# Altium PCB X-CARD-Adapter.PcbDoc
Units mil, origin at the board's own origin, x right, y up, seen from the top; angles counter-clockwise.
Board outline 5300 x 4675 mil, 2 copper layers (Top Layer, Bottom Layer); 86 components, 126 nets, 441 pads, 81 vias.
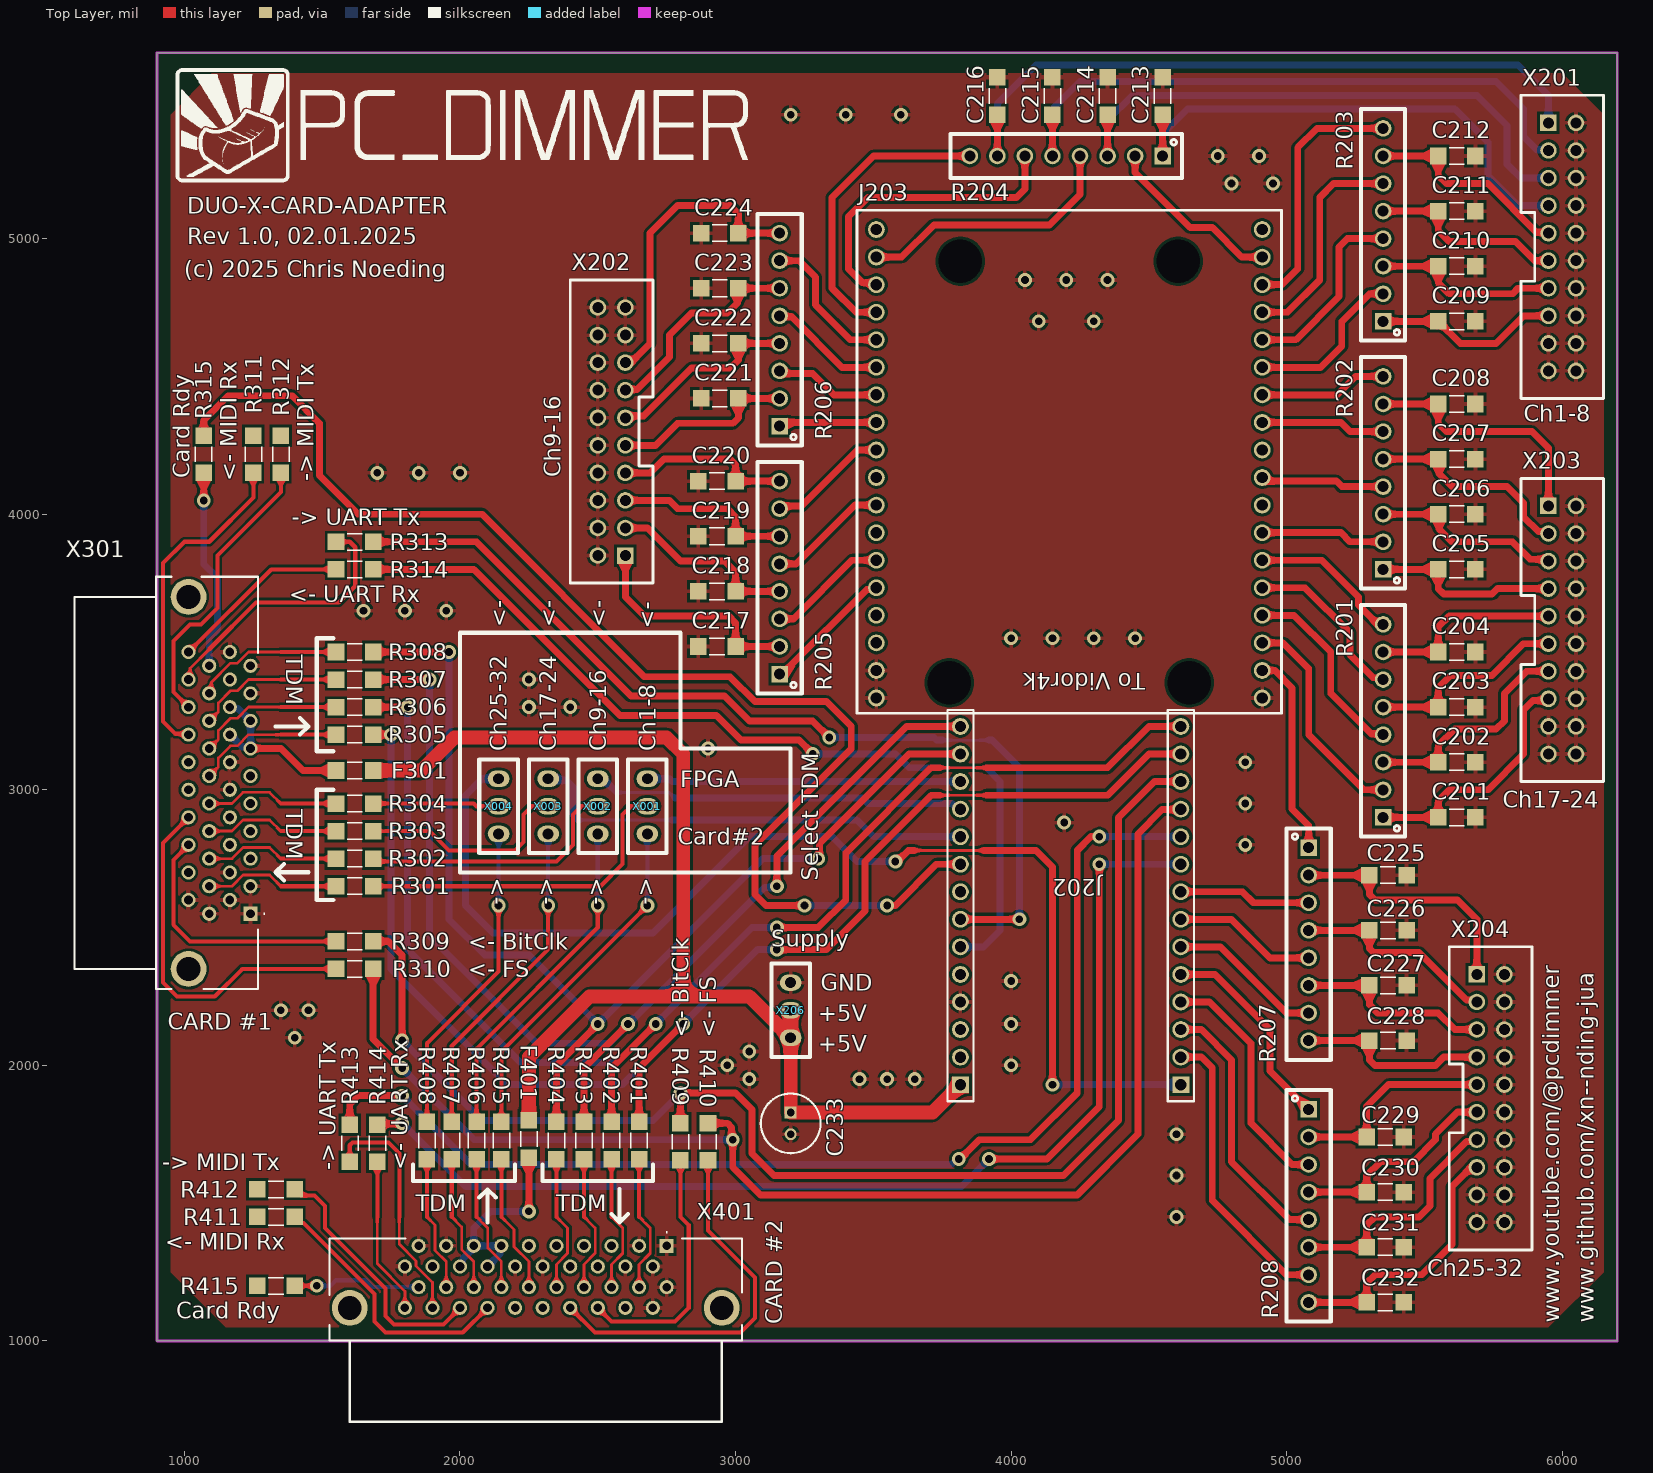
[diagram p0: Top Layer view]
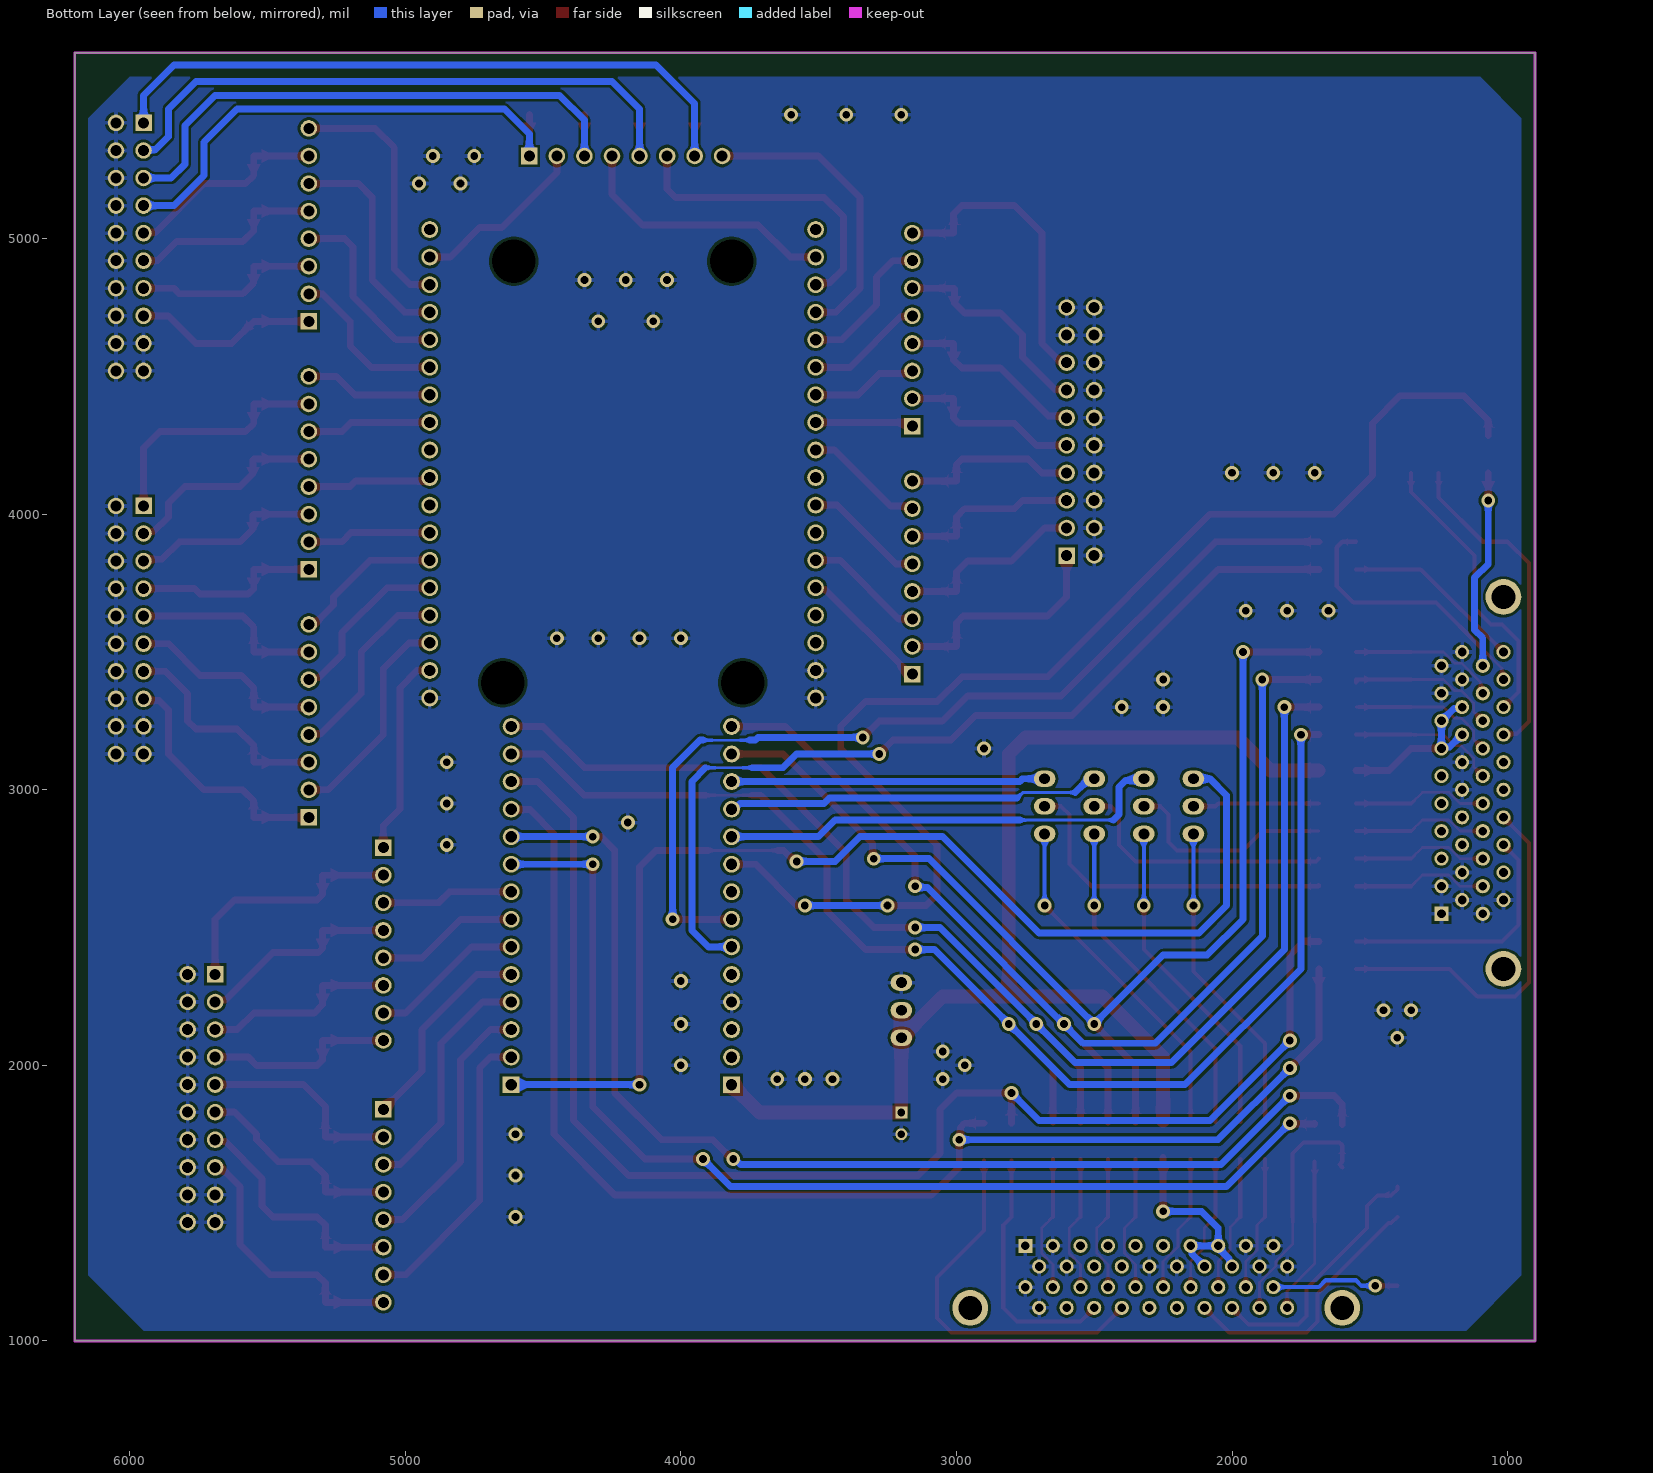
[diagram p1: Bottom Layer view, seen from below]

## Layer stack, top to bottom
Top Solder: solder mask 0.4, Solder Resist, Dk 3.5
Top Layer: signal copper 1.4
Dielectric 1: dielectric 12.6, FR-4, Dk 4.8
Bottom Layer: signal copper 1.4
Bottom Solder: solder mask 0.4, Solder Resist, Dk 3.5

## Board outline
900,1000 900,5675 6200,5675 6200,1000

## Design rules (kind name [scope] priority, off if disabled: settings)
Clearance [All] p1: gap=10 ignorepadtopadclearanceinfootprint=FALSE
Height [All] p1: minheight=0 maxheight=944.88 prefheight=500
PolygonConnect [All] p1: connectstyle=Relief reliefconductorwidth=15 reliefentries=4 polygonreliefangle="90 Angle" airgapwidth=10
RoutingVias [All] p1: holewidth=28 width=50 viastyle="Through Hole" minholewidth=28 minwidth=50 maxholewidth=28 maxwidth=50
SolderMaskExpansion [All] p1: expansion=4 istentingtop=FALSE
SupplyNets "Schematic Supply Nets_1" [InNet('GND')] p1: voltage=0.000
SupplyNets "Schematic Supply Nets" [InNet('+5V')] p2: voltage=0.000
Width [All] p1: maxlimit=50 minlimit=10 preferedwidth=25
29 further rules are at their usual default settings.

## Classes and differential pairs
component class S003: F401 R401 R402 R403 R404 R405 R406 R407 R408 R409 R410 R411 R412 R413 R414 R415 X401
component class Top: X001 X002 X003 X004
component class S001: C201 C202 C203 C204 C205 C206 C207 C208 C209 C210 C211 C212 C213 C214 C215 C216 C217 C218 C219 C220 C221 C222 C223 C224 C225 C226 C227 C228 C229 C230 C231 C232 C233 J202 J203 R201 R202 R203 R204 R205 R206 R207 R208 X201 X202 X203 X204 X206
component class S002: F301 R301 R302 R303 R304 R305 R306 R307 R308 R309 R310 R311 R312 R313 R314 R315 X301

## Components (designator, comment, footprint, x,y, rotation, side; value= is the part's Value field where it differs from the comment)
C201 "330pF" 1206 5550,2900 r0 top
C202 "330pF" 1206 5550,3100 r0 top
C203 "330pF" 1206 5550,3300 r0 top
C204 "330pF" 1206 5550,3500 r0 top
C205 "330pF" 1206 5550,3800 r0 top
C206 "330pF" 1206 5550,4000 r0 top
C207 "330pF" 1206 5550,4200 r0 top
C208 "330pF" 1206 5550,4400 r0 top
C209 "330pF" 1206 5550,4700 r0 top
C210 "330pF" 1206 5550,4900 r0 top
C211 "330pF" 1206 5550,5100 r0 top
C212 "330pF" 1206 5550,5300 r0 top
C213 "330pF" 1206 4550,5450 r90 top
C214 "330pF" 1206 4350,5450 r90 top
C215 "330pF" 1206 4150,5450 r90 top
C216 "330pF" 1206 3950,5450 r90 top
C217 "330pF" 1206 2865,3520 r0 top
C218 "330pF" 1206 2865,3720 r0 top
C219 "330pF" 1206 2865,3920 r0 top
C220 "330pF" 1206 2865,4120 r0 top
C221 "330pF" 1206 2875,4420 r0 top
C222 "330pF" 1206 2875,4620 r0 top
C223 "330pF" 1206 2875,4820 r0 top
C224 "330pF" 1206 2875,5020 r0 top
C225 "330pF" 1206 5435,2690 r180 top
C226 "330pF" 1206 5435,2490 r180 top
C227 "330pF" 1206 5435,2290 r180 top
C228 "330pF" 1206 5435,2090 r180 top
C229 "330pF" 1206 5425,1740 r180 top
C230 "330pF" 1206 5425,1540 r180 top
C231 "330pF" 1206 5425,1340 r180 top
C232 "330pF" 1206 5425,1140 r180 top
C233 "47µF / 25V" CAPPRD200W50D550H1250 3200,1828.74 r270 top
F301 "1206_Fuse" 1206 1550,3070 r0 top
F401 "1206_Fuse" 1206 2250,1665 r90 top
J202 "SSW-114-01-G-S" SMTC-SSW-114-01-X-S 3816.06,1929.84 r90 top
J203 "Vidor4k_PCIE_Adapter" Vidor4K_PCIE_Adapter 4881.06,4603.07 r180 top
R201 "SIL 8-4" SIL8 5350,2900 r180 top
R202 "SIL 8-4" SIL8 5350,3800 r180 top
R203 "SIL 8-4" SIL8 5350,4700 r180 top
R204 "SIL 8-4" SIL8 4550,5300 r270 top
R205 "SIL 8-4" SIL8 3160,3420 r180 top
R206 "SIL 8-4" SIL8 3160,4320 r180 top
R207 "SIL 8-4" SIL8 5080,2790 r0 top
R208 "SIL 8-4" SIL8 5080,1840 r0 top
R301 "100R" 1206 1550,2650 r0 top
R302 "100R" 1206 1550,2750 r0 top
R303 "100R" 1206 1550,2850 r0 top
R304 "100R" 1206 1550,2950 r0 top
R305 "100R" 1206 1550,3200 r0 top
R306 "100R" 1206 1550,3300 r0 top
R307 "100R" 1206 1550,3400 r0 top
R308 "100R" 1206 1550,3500 r0 top
R309 "330R" 1206 1550,2450 r0 top
R310 "330R" 1206 1550,2350 r0 top
R311 "100R" 1206 1250,4150 r90 top
R312 "100R" 1206 1350,4150 r90 top
R313 "330R" 1206 1550,3900 r0 top
R314 "100R" 1206 1550,3800 r0 top
R315 "330R" 1206 1070,4150 r90 top
R401 "100R" 1206 2650,1660 r90 top
R402 "100R" 1206 2550,1660 r90 top
R403 "100R" 1206 2450,1660 r90 top
R404 "100R" 1206 2350,1660 r90 top
R405 "100R" 1206 2150,1660 r90 top
R406 "100R" 1206 2060,1660 r90 top
R407 "100R" 1206 1970,1660 r90 top
R408 "100R" 1206 1880,1660 r90 top
R409 "330R" 1206 2800,1655 r90 top
R410 "330R" 1206 2900,1655 r90 top
R411 "100R" 1206 1400,1450 r180 top
R412 "100R" 1206 1400,1550 r180 top
R413 "330R" 1206 1600,1650 r90 top
R414 "100R" 1206 1700,1650 r90 top
R415 "330R" 1206 1400,1200 r180 top
X001 "Supply" "1x3 Jumper" 2680,2940 r270 top
X002 "Supply" "1x3 Jumper" 2500,2940 r270 top
X003 "Supply" "1x3 Jumper" 2320,2940 r270 top
X004 "Supply" "1x3 Jumper" 2140,2940 r270 top
X201 "Steckerleiste_2x10" steckerleiste_2x10 6050,5420 r270 top
X202 "Steckerleiste_2x10" steckerleiste_2x10 2500,3850 r90 top
X203 "Steckerleiste_2x10" steckerleiste_2x10 6050,4030 r270 top
X204 "Steckerleiste_2x10" steckerleiste_2x10 5790,2330 r270 top
X206 "Supply" "1x3 Jumper" 3200,2200 r90 top
X301 "TX24-40R-LT-H1E" TX2440RLTH1E 1240,2550 r270 top
X401 "TX24-40R-LT-H1E" TX2440RLTH1E 2750,1345 r0 top

## Footprints (in the part's own frame and the unit in brackets; to place one, negate y for a bottom-side part, rotate by r counter-clockwise, add the part's x,y. Pads: shape width x height; smd on the part's side, far side on the other; paste and mask are expansions set on the pad)
"1x3 Jumper" [mm]
  oval 1.5x2 hole 1: 1(-2.54,0) 2(0,0) 3(2.54,0)
  silkscreen extent -4.32,-1.78 4.32,1.78
1206 [mil] "Standard 1206 Device"
  rect 60x60 smd: 1(0,0) 2(135,0)
  silkscreen extent 40,-30 95,30, body extent -15,-25 155,25, height 39
CAPPRD200W50D550H1250 [mm]
  rect 1.1x1.1 hole 0.7: 1(0,0)
  round 1.1 hole 0.7: 2(2,0)
  silkscreen extent -1.75,-2.75 3.75,2.75, body extent -1.74,-2.75 3.75,2.75, height 12.5
SIL8 [mil]
  rect 60x60 hole 40: 1(0,0)
  round 60 hole 40: 2(0,-100) 3(0,-200) 4(0,-300) 5(0,-400) 6(0,-500) 7(0,-600) 8(0,-700)
  silkscreen extent -80,-770 80,70, body extent -80,-770 80,70, height 315
SMTC-SSW-114-01-X-S [mm] "SQ Post Socket, 1x14 Pins, Vertical, 2.54mm Pitch, Female"
  rect 1.55x1.55 hole 1.04: 1(0,-20.32) 15(0,0)
  round 1.55 hole 1.04: 2(2.54,-20.32) 3(5.08,-20.32) 4(7.62,-20.32) 5(10.16,-20.32) 6(12.7,-20.32) 7(15.24,-20.32) 8(17.78,-20.32) 9(20.32,-20.32) 10(22.86,-20.32) 11(25.4,-20.32) 12(27.94,-20.32) 13(30.48,-20.32) 14(33.02,-20.32) 16(2.54,0) 17(5.08,0) 18(7.62,0) 19(10.16,0) 20(12.7,0) 21(15.24,0) 22(17.78,0) 23(20.32,0) 24(22.86,0) 25(25.4,0) 26(27.94,0) 27(30.48,0) 28(33.02,0)
  silkscreen extent -1.53,-21.52 34.55,1.2, body extent -23.46,-22.55 60.92,3.13, height 18.41
steckerleiste_2x10 [mil]
  rect 60x60 hole 40: 1(0,-100)
  round 60 hole 40: 2(0,0) 3(100,-100) 4(100,0) 5(200,-100) 6(200,0) 7(300,-100) 8(300,0) 9(400,-100) 10(400,0) 11(500,-100) 12(500,0) 13(600,-100) 14(600,0) 15(700,-100) 16(700,0) 17(800,-100) 18(800,0) 19(900,-100) 20(900,0)
  silkscreen extent -100,-200 1000,100, body extent -100,-200 1000,100, height 394
TX2440RLTH1E [mm]
  rect 1.3x1.3 hole 0.8: 1(0,0)
  round 1.3 hole 0.8: 2(-1.27,-1.905) 3(-2.54,0) 4(-3.81,-1.905) 5(-5.08,0) 6(-6.35,-1.905) 7(-7.62,0) 8(-8.89,-1.905) 9(-10.16,0) 10(-11.43,-1.905) 11(-12.7,0) 12(-13.97,-1.905) 13(-15.24,0) 14(-16.51,-1.905) 15(-17.78,0) 16(-19.05,-1.905) 17(-20.32,0) 18(-21.59,-1.905) 19(-22.86,0) 20(-24.13,-1.905) 21(0,-3.81) 22(-1.27,-5.715) 23(-2.54,-3.81) 24(-3.81,-5.715) 25(-5.08,-3.81) 26(-6.35,-5.715) 27(-7.62,-3.81) 28(-8.89,-5.715) 29(-10.16,-3.81) 30(-11.43,-5.715) 31(-12.7,-3.81) 32(-13.97,-5.715) 33(-15.24,-3.81) 34(-16.51,-5.715) 35(-17.78,-3.81) 36(-19.05,-5.715) 37(-20.32,-3.81) 38(-21.59,-5.715) 39(-22.86,-3.81) 40(-24.13,-5.715)
  round 3.3 hole 2.2: 41(5.08,-5.715) 42(-29.21,-5.715)
  silkscreen extent -31.07,-16.21 6.94,1.3, body extent -31.06,-16.21 6.94,0.69, height 9.01
Vidor4K_PCIE_Adapter [mm]
  round 0 hole 4: 0(5.969,30.861) 0(6.985,-8.001) 0(27.051,-8.001) 0(28.067,30.861)
  round 1.55 hole 1.04: 1(-0.762,32.258) 2(-0.762,29.718) 3(-0.762,27.178) 4(-0.762,24.638) 5(-0.762,22.098) 6(-0.762,19.558) 7(-0.762,17.018) 8(-0.762,14.478) 9(-0.762,11.938) 10(-0.762,9.398) 11(-0.762,6.858) 12(-0.762,4.318) 13(-0.762,1.778) 14(-0.762,-0.762) 15(-0.762,-3.302) 16(-0.762,-5.842) 17(-0.762,-8.382) 18(-0.762,-10.922) 19(34.798,-10.922) 20(34.798,-8.382) 21(34.798,-5.842) 22(34.798,-3.302) 23(34.798,-0.762) 24(34.798,1.778) 25(34.798,4.318) 26(34.798,6.858) 27(34.798,9.398) 28(34.798,11.938) 29(34.798,14.478) 30(34.798,17.018) 31(34.798,19.558) 32(34.798,22.098) 33(34.798,24.638) 34(34.798,27.178) 35(34.798,29.718) 36(34.798,32.258)
  silkscreen extent -2.54,-12.7 36.58,33.65, body extent -2.5,-12.5 36.5,33.5, height 11.6

## Part data
C201 C202 C203 C204 C205 C206 C207 C208 C209 C210 C211 C212 C213 C214 C215 C216 C217 C218 C219 C220 C221 C222 C223 C224 C225 C226 C227 C228 C229 C230 C231 C232: library part 1206_C_1nF/63V, "1206_C"
C233: library part MAL214256479E3, "Capacitor Polarised"
J202: library part "Arduino MKR Vidor 4000", "SQ Post Socket, Through-hole, Vertical, -55 to 125 degC, 2.54 mm Pitch, 14-Pin, Female, RoHS"
R301 R302 R303 R304 R307 R308 R309 R310 R311 R312 R313 R314 R315 R401 R402 R403 R404 R407 R408 R409 R410 R411 R412 R413 R414 R415: library part 1206_R, "1206_R"
R305 R306 R405 R406: library part 1206_R, "330R"
X001 X002 X003 X004 X206: library part "1x3 Jumper"
X301 X401: "Connector"

## Via types
v1: diameter 50, hole 28, Top Layer to Bottom Layer, 81 vias

## Nets (pads, with @x,y where several pads share a name; then routed paths per layer and width w, separated by ;. In a path a pad name is that pad's centre, name@x,y a point inside that pad or via, vN(x,y) a via of type N, cw(c..) or ccw(c..) an arc to the next point about the centre after c; other vN are vias at no path point)
+5V: C233.1 F301.2 F401.2 J202.15 X206.1 X206.2 | length 4446.3
  Top Layer w50: F301.2 1860,3070 1980,3190 2750,3190 2810,3130 2810,2250 ; F401.2 2250,2030 2470,2250 2810,2250 ; X206.2 X206.1 ; J202.15 3714.96,1828.74 C233.1 X206.1 ; 2810,2250 3050,2250 3188.42,2111.58 3188.42,2104.18 3192.61,2100 X206.1
Ch1: C209.1 R203.1 X201.15 | length 674.6
  Top Layer w25: R203.1 C209.1 5630,4620 5760,4620 5860,4720 X201.15
Ch2: C210.1 R203.3 X201.13 | length 684.9
  Top Layer w25: R203.3 C210.1 5550,4840 5590,4800 5820,4800 5840,4820 X201.13
Ch3: C211.1 R203.5 X201.11 | length 715.6
  Top Layer w25: R203.5 C211.1 5550,5030 5590,4990 5830,4990 5900,4920 X201.11
Ch4: C212.1 R203.7 X201.9 | length 757
  Top Layer w25: R203.7 C212.1 5550,5230 5580,5200 5730,5200 5907.27,5022.73 5947.27,5022.73 X201.9
Ch5: C213.1 R204.1 X201.7 | length 1882.5
  Top Layer w25: R204.1 C213.1
  Bottom Layer w25: R204.1 4550,5380 4640,5470 5610,5470 5730,5350 5730,5230 5840,5120 X201.7
Ch6: C214.1 R204.3 X201.5 | length 2123.6
  Top Layer w25: R204.3 C214.1
  Bottom Layer w25: R204.3 4350,5430 4440,5520 5690,5520 5800,5410 5800,5270 5850,5220 X201.5
Ch7: C215.1 R204.5 X201.3 | length 2323.6
  Top Layer w25: R204.5 C215.1
  Bottom Layer w25: R204.5 4150,5470 4250,5570 5760,5570 5860,5470 5860,5370 5907.27,5322.73 5947.27,5322.73 X201.3
Ch8: C216.1 R204.7 X201.1 | length 2543.6
  Top Layer w25: R204.7 C216.1
  Bottom Layer w25: R204.7 3950,5490 4090,5630 5840,5630 5950,5520 X201.1
Ch9: C217.2 R205.2 X202.1 | length 834.6
  Top Layer w25: X202.1 2600,3700 2670,3630 2975.36,3630 3000,3605.36 C217.2 R205.2
Ch10: C218.2 R205.4 X202.3 | length 696.3
  Top Layer w25: X202.3 2680,3950 2800,3830 2960,3830 3000,3790 C218.2 R205.4
Ch11: C219.2 R205.6 X202.5 | length 654.9
  Top Layer w25: X202.5 2760,4050 2790,4020 2970,4020 3000,3990 C219.2 R205.6
Ch12: C220.2 R205.8 X202.7 | length 649
  Top Layer w25: X202.7 2690,4150 2740,4200 2980,4200 3000,4180 C220.2 R205.8
Ch13: C221.2 R206.2 X202.9 | length 671.4
  Top Layer w25: X202.9 2710,4250 2790,4330 2990,4330 3010,4350 C221.2 R206.2
Ch14: C222.2 R206.4 X202.11 | length 707
  Top Layer w25: X202.11 2606.7,4356.7 2666.7,4356.7 2840,4530 2980,4530 3010,4560 C222.2 R206.4
Ch15: C223.2 R206.6 X202.13 | length 789.4
  Top Layer w25: X202.13 2602.73,4452.73 2642.73,4452.73 2760,4570 2760,4650 2840,4730 2970,4730 3007.14,4767.14 3007.14,4817.14 C223.2 3020,4820 R206.6
Ch16: C224.2 R206.8 X202.15 | length 1112.8
  Top Layer w25: X202.15 2606.7,4556.7 2626.7,4556.7 2690,4620 2690,5020 2790,5120 2980,5120 3010,5090 C224.2 R206.8
Ch17: C208.1 R202.7 X203.1 | length 917.3
  Top Layer w25: R202.7 C208.1 5550,4330 5580,4300 5890,4300 5950,4240 X203.1
Ch18: C207.1 R202.5 X203.3 | length 770.4
  Top Layer w25: R202.5 C207.1 5552.86,4197.14 5552.86,4147.14 5600,4100 5800,4100 5860,4040 5860,3990 5913.3,3936.7 5943.3,3936.7 X203.3
Ch19: C206.1 R202.3 X203.5 | length 699.7
  Top Layer w25: R202.3 C206.1 5552.86,3997.14 5552.86,3947.14 5600,3900 5820,3900 5883.3,3836.7 5943.3,3836.7 X203.5
Ch20: C205.1 R202.1 X203.7 | length 686.6
  Top Layer w25: R202.1 C205.1 5550,3730 5570,3710 5745.26,3710 5765.26,3730 X203.7
Ch21: C204.1 R201.7 X203.9 | length 706.6
  Top Layer w25: R201.7 C204.1 5550,3590 5590,3630 X203.9
Ch22: C203.1 R201.5 X203.11 | length 736.3
  Top Layer w25: R201.5 C203.1 5550,3370 5595,3415 5745,3415 5860,3530 X203.11
Ch23: C202.1 R201.3 X203.13 | length 830.4
  Top Layer w25: R201.3 C202.1 5550,3160 5610,3220 5760,3220 5790,3250 5790,3350 5870,3430 X203.13
Ch24: C201.1 R201.1 X203.15 | length 907
  Top Layer w25: R201.1 C201.1 5550,2960 5590,3000 5730,3000 5860,3130 5860,3290 5893.3,3323.3 5943.3,3323.3 X203.15
Ch25: C225.2 R207.2 X204.1 | length 917.3
  Top Layer w25: R207.2 C225.2 5300,2620 5320,2600 5620,2600 5690,2530 X204.1
Ch26: C226.2 R207.4 X204.3 | length 756
  Top Layer w25: R207.4 C226.2 5300,2424.64 5314.64,2410 5480,2410 5653.3,2236.7 5683.3,2236.7 X204.3
Ch27: C227.2 R207.6 X204.5 | length 717.3
  Top Layer w25: R207.6 C227.2 5300,2220 5330,2190 5550,2190 5610,2130 X204.5
Ch28: C228.2 R207.8 X204.7 | length 700.7
  Top Layer w25: R207.8 C228.2 5300,2020 5320,2000 5540,2000 5570,2030 X204.7
Ch29: C229.2 R208.2 X204.9 | length 753.1
  Top Layer w25: R208.2 C229.2 5290,1850 5370,1930 X204.9
Ch30: C230.2 R208.4 X204.11 | length 777
  Top Layer w25: R208.4 C230.2 5290,1600 5340,1650 5460,1650 5540,1730 5540,1750 5620,1830 X204.11
Ch31: C231.2 R208.6 X204.13 | length 877
  Top Layer w25: R208.6 C231.2 5290,1420 5320,1450 5480,1450 5520,1490 5520,1590 5653.3,1723.3 5683.3,1723.3 X204.13
Ch32: C232.2 R208.8 X204.15 | length 977
  Top Layer w25: R208.8 C232.2 5290,1210 5320,1240 5490,1240 5600,1350 5600,1560 5663.3,1623.3 5683.3,1623.3 X204.15
GND: C201.2 C202.2 C203.2 C204.2 C205.2 C206.2 C207.2 C208.2 C209.2 C210.2 C211.2 C212.2 C213.2 C214.2 C215.2 C216.2 C217.1 C218.1 C219.1 C220.1 C221.1 C222.1 C223.1 C224.1 C225.1 C226.1 C227.1 C228.1 C229.1 C230.1 C231.1 C232.1 C233.2 J202.18 J203.1 J203.35 J203.36 X201.2 X201.4 X201.6 X201.8 X201.10 X201.12 X201.14 X201.16 X201.17 X201.18 X201.19 X201.20 X202.2 X202.4 X202.6 X202.8 X202.10 X202.12 X202.14 X202.16 X202.17 X202.18 X202.19 X202.20 X203.2 X203.4 X203.6 X203.8 X203.10 X203.12 X203.14 X203.16 X203.17 X203.18 X203.19 X203.20 X204.2 X204.4 X204.6 X204.8 X204.10 X204.12 X204.14 X204.16 X204.17 X204.18 X204.19 X204.20 X206.3 X301.1 X301.2 X301.3 X301.4 X301.10 X301.12 X301.17 X301.18 X301.19 X301.20 X301.21 X301.22 X401.1 X401.2 X401.3 X401.4 X401.10 X401.12 X401.17 X401.18 X401.19 X401.20 X401.21 X401.22
  other v1: 4600,1450 4600,1600 4600,1750 3050,1950 3450,1950 3550,1950 3650,1950 2970,2000 4000,2000 3050,2050 1400,2100 4000,2150 1350,2200 1450,2200 4000,2306.16 4850,2800 4192.42,2880.88 4850,2950 4850,3100 2900,3150 2250,3300 2400,3300 2250,3400 4000,3550 4150,3550 4300,3550 4450,3550 1650,3650 1800,3650 1950,3650 1700,4150 1850,4150 2000,4150 4100,4700 4300,4700 4050,4850 4200,4850 4350,4850 4800,5200 4950,5200 4750,5300 4900,5300 3200,5450 3400,5450 3600,5450
NetF301_1: F301.1 X301.13 X301.14 X301.15 X301.16 | length 634.6
  Top Layer w25: X301.13 1350,3150 1430,3070 F301.1
  Bottom Layer w25: X301.14 1209.99,3155.01 1234.99,3155.01 X301.13 X301.15 1195.01,3294.99 1170.01,3294.99 X301.16
NetF401_1: F401.1 X401.13 X401.14 X401.15 X401.16 | length 776.3
  Top Layer w25: v1(2250,1470) F401.1
  Bottom Layer w25: X401.16 2010,1280 2010,1297.92 2050,1337.92 X401.15 ; X401.14 2144.99,1314.99 2144.99,1339.99 X401.13 X401.15 ; v1(2250,1470) 2110,1470 2050,1410 X401.15
NetJ202_1: J202.1 X004.1 | length 4199.9
  Top Layer w10: 3650,2780 3900,2780
  Top Layer w25: v1(3580,2740) 3586.76,2740 3626.76,2780 3650,2780 ; 3900,2780 4090,2780 4150.16,2719.84 v1(4150.16,1929.84)
  Bottom Layer w25: X004.1 2080,3040 2020,2980 2020,2580 2120,2480 2700,2480 3050,2830 3350,2830 3440,2740 v1(3580,2740) ; v1(4150.16,1929.84) J202.1 J202.1@4619.84,1929.84
NetJ202_2: J202.2 R208.7 | length 1072.3
  Top Layer w25: J202.2 4690.16,2029.84 4730,1990 4730,1510 5000,1240 R208.7
NetJ202_3: J202.3 R208.5 | length 966.4
  Top Layer w25: J202.3 4690.16,2129.84 4800,2020 4800,1650 5010,1440 R208.5
NetJ202_4: J202.4 R208.3 | length 878.1
  Top Layer w25: J202.4 4720.16,2229.84 4870,2080 4870,1790 5020,1640 R208.3
NetJ202_5: J202.5 R208.1 | length 754.7
  Top Layer w25: J202.5 4740.16,2329.84 4940,2130 4940,1980 R208.1
NetJ202_6: J202.6 R207.7 | length 563.3
  Top Layer w25: J202.6 4760.16,2429.84 5000,2190 R207.7
NetJ202_7: J202.7 R207.5 | length 521.9
  Top Layer w25: J202.7 4800.16,2529.84 4940,2390 R207.5
NetJ202_8: J202.8 R207.3 | length 480.4
  Top Layer w25: J202.8 4840.16,2629.84 4880,2590 R207.3
NetJ202_9: J202.9 R414.2 | length 4018.6
  Top Layer w25: R414.2 1700,1790 1702.5,1787.5 1787.5,1787.5 v1(1790,1790) ; v1(3920,1660) 4130,1660 4320,1850 v1(4320,2730)
  Bottom Layer w25: v1(1790,1790) 2020,1560 3820,1560 v1(3920,1660) ; v1(4320,2730) 4320.08,2729.92 4615.98,2729.92 J202.9
NetJ202_10: J202.10 R413.2 | length 4215.5
  Top Layer w25: R413.2 1600,1860 1630,1890 v1(1790,1890) ; v1(3810,1660) 3815.02,1660 3885.02,1730 4070,1730 4240,1900 4240,2780 4290,2830 v1(4320,2830)
  Bottom Layer w25: v1(1790,1890) 2040,1640 3783.24,1640 3803.24,1660 v1(3810,1660) ; v1(4320,2830) 4320.08,2829.92 4615.98,2829.92 J202.10
NetJ202_11: J202.11 R310.2 R410.2 | length 4835.3
  Top Layer w25: R310.2 1685,2095 v1(1790,1990) ; R410.2 2970,1790 2985.22,1774.78 2985.22,1734.78 v1(2990,1730) 2990,1630 3090,1530 4240,1530 4460,1750 4460,2840 4548.05,2928.05 4614.27,2928.05 J202.11
  Bottom Layer w25: v1(1790,1990) 2050,1730 v1(2990,1730)
NetJ202_12: J202.12 R309.2 R409.2 | length 4987.9
  Top Layer w25: R309.2 1740,2450 1790,2400 v1(1790,2090) ; R409.2 v1(2800,1900) 3000,1900 3060,1840 3060,1680 3140,1600 4190,1600 4390,1800 4390,2900 4519.84,3029.84 J202.12
  Bottom Layer w25: v1(1790,2090) 2080,1800 2700,1800 v1(2800,1900)
NetJ202_13: J202.13 R305.2 R401.2 | length 4978.7
  Top Layer w10: 3740,2980 3910,2980
  Top Layer w25: R305.2 v1(1750,3200) ; R401.2 2650,1990 v1(2810,2150) ; v1(3150,2420) 3330,2420 3470,2560 3470,2740 3710,2980 3740,2980 ; 3910,2980 4350,2980 4499.84,3129.84 J202.13
  Bottom Layer w25: v1(1750,3200) 1750,2350 2170,1930 2590,1930 v1(2810,2150) 3080,2420 v1(3150,2420)
NetJ202_14: J202.14 R306.2 R402.2 | length 5007
  Top Layer w10: 3740,3080 3910,3080
  Top Layer w25: R306.2 v1(1810,3300) ; R402.2 2550,1990 v1(2710,2150) ; v1(3150,2500) 3300,2500 3400,2600 3400,2770 3710,3080 3740,3080 ; 3910,3080 4350,3080 4499.84,3229.84 J202.14
  Bottom Layer w25: v1(1810,3300) 1810,2420 2220,2010 2570,2010 v1(2710,2150) 3060,2500 v1(3150,2500)
NetJ202_20: J202.20 R314.2 | length 3302.8
  Top Layer w25: R314.2 2050,3800 2580,3270 2930,3270 3020,3180 3230,3180 v1(3280,3130)
  Bottom Layer w10: 3740,3080 3910,3080
  Bottom Layer w25: v1(3280,3130) 3580,3130 3630,3080 3740,3080 ; J202.20 3899.84,2429.84 3960,2490 3960,3030 3910,3080
NetJ202_21: J202.21 R313.2 | length 3448.7
  Top Layer w25: R313.2 2060,3900 2620,3340 2960,3340 3050,3250 3280,3250 v1(3340,3190) ; J202.21 3816.14,2529.92 4029.92,2529.92 v1(4030,2530)
  Bottom Layer w10: 3750,3180 3920,3180
  Bottom Layer w25: v1(3340,3190) 3720,3190 3730,3180 3750,3180 ; 3920,3180 3930,3180 4030,3080 v1(4030,2530)
NetJ202_23: J202.23 R315.2 | length 4630.3
  Top Layer w25: R315.2 1070,4340 1160,4430 1390,4430 1490,4330 1490,4140 1630,4000 2080,4000 2670,3410 2980,3410 3070,3320 3330,3320 3420,3230 3420,3150 3070,2800 3070,2620 3110,2580 v1(3250,2580) ; v1(3550,2580) 3580,2580 3729.84,2729.84 J202.23
  Bottom Layer w25: v1(3250,2580) v1(3550,2580)
NetJ202_24: J202.24 X003.1 | length 1641.7
  Bottom Layer w10: 2430,2890 2770,2890
  Bottom Layer w25: X003.1 2326.52,3033.48 2386.52,3033.48 2410,3010 2410,2910 2430,2890 ; 2770,2890 3440,2890 3500.16,2829.84 J202.24
NetJ202_25: J202.25 X002.1 | length 1361.7
  Bottom Layer w10: 2569.06,2990 2760,2990 2780,2970
  Bottom Layer w25: X002.1 2519.06,3040 2569.06,2990 ; 2780,2970 3460,2970 3480,2950 3786.16,2950 3806.32,2929.84 J202.25
NetJ202_26: J202.26 X001.1 | length 1140.3
  Bottom Layer w25: X001.1 2760,3040 2770.16,3029.84 J202.26
NetJ202_27: J202.27 R308.2 R404.2 | length 4110.7
  Top Layer w25: R308.2 v1(1960,3500) ; R404.2 2350,2000 v1(2500,2150) ; v1(3300,2750) 3304.78,2754.78 3304.78,2804.78 3629.84,3129.84 J202.27
  Bottom Layer w25: v1(1960,3500) 1960,2530 2090,2400 2250,2400 v1(2500,2150) 3100,2750 v1(3300,2750)
NetJ202_28: J202.28 R307.2 R403.2 | length 4184.6
  Top Layer w25: R307.2 v1(1890,3400) ; R403.2 2450,1990 v1(2610,2150) ; v1(3150,2650) 3150,2760 3619.84,3229.84 J202.28
  Bottom Layer w25: v1(1890,3400) 1890,2470 2280,2080 2540,2080 3105.22,2645.22 3145.22,2645.22 v1(3150,2650)
NetJ203_2: J203.2 R207.1 | length 739.9
  Top Layer w25: J203.2 4911.22,3432.91 4957.09,3432.91 5020,3370 5020,2930 5080,2870 R207.1
NetJ203_3: J203.3 R201.2 | length 800.3
  Top Layer w25: J203.3 4986.93,3533.07 5080,3440 5080,3200 5280,3000 R201.2
NetJ203_4: J203.4 R201.4 | length 709
  Top Layer w25: J203.4 4911.06,3631.06 4913.07,3633.07 5026.93,3633.07 5160,3500 5160,3350 5307.27,3202.73 5347.27,3202.73 R201.4
NetJ203_5: J203.5 R201.6 | length 623.8
  Top Layer w25: J203.5 5066.93,3733.07 5230,3570 5230,3490 5313.3,3406.7 5343.3,3406.7 R201.6
NetJ203_6: J203.6 R201.8 | length 553.1
  Top Layer w25: J203.6 5126.93,3833.07 5260,3700 5260,3670 5323.3,3606.7 5343.3,3606.7 R201.8
NetJ203_7: J203.7 R202.2 | length 452.6
  Top Layer w25: J203.7 5196.93,3933.07 5230,3900 R202.2
NetJ203_9: J203.9 R202.4 | length 452.6
  Top Layer w25: J203.9 4920.81,4133.07 4933.88,4120 5180,4120 5200,4100 R202.4
NetJ203_11: J203.11 R202.6 | length 461
  Top Layer w25: J203.11@4916.93,4333.07 J203.11 4914.13,4330 4917.2,4333.07 5196.93,4333.07 5230,4300 R202.6
NetJ203_12: J203.12 R202.8 | length 466.7
  Top Layer w25: J203.12 5183.07,4433.07 5250,4500 R202.8
NetJ203_13: J203.13 R203.2 | length 602.2
  Top Layer w25: J203.13 5123.07,4533.07 5200,4610 5200,4700 5300,4800 R203.2
NetJ203_14: J203.14 R203.4 | length 698.9
  Top Layer w25: J203.14 4914.13,4630 4917.2,4633.07 5033.07,4633.07 5190,4790 5190,4970 5220,5000 R203.4
NetJ203_15: J203.15 R203.6 | length 808.1
  Top Layer w25: J203.15 5003.07,4733.07 5120,4850 5120,5150 5170,5200 R203.6
NetJ203_16: J203.16 R203.8 | length 931.5
  Top Layer w25: J203.16 4983.07,4833.07 5040,4890 5040,5330 5110,5400 R203.8
NetJ203_17: J203.17 R204.2 | length 648.2
  Top Layer w25: R204.2 4450,5240 4650,5040 4730,5040 4836.93,4933.07 J203.17
NetJ203_20: J203.20 R204.4 | length 972.9
  Top Layer w25: J203.20 3603.07,4933.07 3720,5050 4140,5050 4250,5160 R204.4
NetJ203_21: J203.21 R204.6 | length 1118.1
  Top Layer w25: J203.21@3511.06,4831.06 J203.21 3504.13,4840 3504.1,4839.96 3494.42,4839.96 3494.39,4840 3460,4840 3410,4890 3410,5080 3480,5150 4020,5150 4050,5180 R204.6
NetJ203_22: J203.22 R204.8 | length 1089.2
  Top Layer w25: J203.22 3436.93,4733.07 3350,4820 3350,5150 3500,5300 R204.8
NetJ203_23: J203.23 R206.7 | length 528.5
  Top Layer w25: R206.7 3230,4920 3290,4860 3290,4760 3416.93,4633.07 J203.23
NetJ203_24: J203.24 R206.5 | length 428.5
  Top Layer w25: R206.5 3162.73,4717.27 3202.73,4717.27 3386.93,4533.07 J203.24
NetJ203_25: J203.25 R206.3 | length 395.7
  Top Layer w25: R206.3 3160,4510 3163.3,4513.3 3176.17,4513.3 3179.47,4510 3280,4510 3356.93,4433.07 J203.25
NetJ203_26: J203.26 R206.1 | length 356.5
  Top Layer w25: R206.1 3173.07,4333.07 J203.26
NetJ203_27: J203.27 R205.7 | length 445.2
  Top Layer w25: R205.7 3160,4030 3240,4030 3443.07,4233.07 J203.27
NetJ203_29: J203.29 R205.5 | length 439.3
  Top Layer w25: R205.5 3220,3820 3433.07,4033.07 J203.29
NetJ203_31: J203.31 R205.3 | length 439.3
  Top Layer w25: R205.3 3210,3620 3423.07,3833.07 J203.31
NetJ203_32: J203.32 R205.1 | length 480.7
  Top Layer w25: R205.1 3177.5,3437.5 3187.5,3437.5 3476.18,3726.18 3504.17,3726.18 J203.32
NetR301_1: R301.1 X301.23 | length 493.6
  Top Layer w10: X301.23 1172.4,2650 1212.99,2690.59 1309.41,2690.59 1350,2650
  Top Layer w15: 1350,2650 R301.1
NetR301_2: R301.2 X001.2 | length 1227.6
  Top Layer w15: R301.2 1685,2655 1690,2650 2510,2650 2590,2730 2590,2910 2620,2940 X001.2
NetR302_1: R302.1 X301.25 | length 493.6
  Top Layer w10: X301.25 1172.4,2750 1212.99,2790.59 1309.41,2790.59 1350,2750
  Top Layer w15: 1350,2750 R302.1
NetR302_2: R302.2 X002.2 | length 966.4
  Top Layer w15: R302.2 1695,2740 2350,2740 2410,2800 2410,2910 2440,2940 X002.2
NetR303_1: R303.1 X301.27 | length 493.6
  Top Layer w10: X301.27 1172.4,2850 1212.99,2890.59 1309.41,2890.59 1350,2850
  Top Layer w15: 1350,2850 R303.1
NetR303_2: R303.2 X003.2 | length 798.7
  Top Layer w10: R303.2 1730,2850 ; X003.2@2310.16,2940 X003.2
  Top Layer w15: 1730,2850 1890,2850 1960,2780 2200,2780 2230,2810 2230,2910 2260,2940 X003.2
NetR304_1: R304.1 X301.29 | length 493.6
  Top Layer w10: X301.29 1172.4,2950 1212.99,2990.59 1309.41,2990.59 1350,2950
  Top Layer w15: 1350,2950 R304.1
NetR304_2: R304.2 X004.2 | length 459.1
  Top Layer w15: R304.2 2050,2950 2060,2940 X004.2
NetR305_1: R305.1 X301.31 | length 541.1
  Top Layer w10: X301.31 1123.03,3083.03 1123.03,3115.44 1167.01,3159.41 1192.01,3159.41 1232.6,3200 1350,3200
  Top Layer w15: 1350,3200 R305.1
NetR306_1: R306.1 X301.33 | length 541.1
  Top Layer w10: X301.33 1123.03,3183.03 1123.03,3215.44 1167.01,3259.41 1192.01,3259.41 1232.6,3300 1350,3300 ; R306.1@1540,3300 R306.1
  Top Layer w15: 1350,3300 R306.1@1540,3300
NetR307_1: R307.1 X301.35 | length 565.3
  Top Layer w10: X301.35 1123.03,3283.03 1123.03,3315.44 1167.01,3359.41 1192.01,3359.41 1232.6,3400 1350,3400 ; R307.1@1550,3390 R307.1
  Top Layer w15: 1350,3400 R307.1@1540,3400 ; R307.1@1550,3390 R307.1@1540,3400 ; R307.1 R307.1@1540,3400
NetR308_1: R308.1 X301.37 | length 541.1
  Top Layer w10: X301.37 1097.88,3357.88 1097.88,3390.28 1167.01,3459.41 1192.01,3459.41 1232.6,3500 1350,3500
  Top Layer w15: 1350,3500 R308.1
NetR309_1: R309.1 X301.26 | length 927.6
  Top Layer w15: X301.26 960,2745 960,2510 1020,2450 R309.1
NetR310_1: R310.1 X301.28 | length 1327.9
  Top Layer w15: X301.28 922.5,2807.5 922.5,2300 972.5,2250 1110,2250 1210,2350 R310.1
NetR311_1: R311.1 X301.34 | length 1203.1
  Top Layer w15: X301.34 1011.91,3203.09 966.91,3203.09 922.5,3247.5 922.5,3822.5 1000,3900 1090,3900 1250,4060 R311.1
NetR311_2: R311.2
NetR312_1: R312.1 X301.36 | length 1057.8
  Top Layer w15: X301.36 960,3355 960,3540 1020,3600 1060,3600 1120,3660 1120,3850 1350,4080 R312.1
NetR312_2: R312.2
NetR313_1: R313.1 X301.38 | length 984.6
  Top Layer w10: X301.38 1020.59,3405.59 1020.59,3440.59 1090,3510
  Top Layer w15: 1090,3510 1260,3680 1560,3680 1620,3740 1620,3880 1600,3900 R313.1
NetR314_1: R314.1 X301.40 | length 659.3
  Top Layer w15: X301.40 1315,3800 R314.1
NetR315_1: R315.1 X301.39 | length 733.1
  Top Layer w25: v1(1070,4050) R315.1
  Bottom Layer w25: v1(1070,4050) 1070,3820 1120,3770 1120,3580 1090,3550 X301.39
NetR401_1: R401.1 X401.23 | length 498.6
  Top Layer w10: X401.23 2650,1277.4 2690.59,1317.99 2690.59,1409.41 2650,1450
  Top Layer w15: 2650,1450 R401.1
NetR402_1: R402.1 X401.25 | length 498.6
  Top Layer w10: X401.25 2550,1277.4 2590.59,1317.99 2590.59,1409.41 2550,1450
  Top Layer w15: 2550,1450 R402.1
NetR403_1: R403.1 X401.27 | length 498.6
  Top Layer w10: X401.27 2450,1277.4 2490.59,1317.99 2490.59,1409.41 2450,1450
  Top Layer w15: 2450,1450 R403.1
NetR404_1: R404.1 X401.29 | length 498.6
  Top Layer w10: X401.29 2350,1277.4 2390.59,1317.99 2390.59,1409.41 2350,1450
  Top Layer w15: 2350,1450 R404.1
NetR405_1: R405.1 X401.31 | length 506.4
  Top Layer w10: 2150,1450 2196.06,1403.94 2196.06,1341.54 2250,1287.6 X401.31
  Top Layer w15: 2150,1450 R405.1
NetR405_2: R405.2 X001.3 | length 1264.5
  Top Layer w15: R405.2 2150,2050 v1(2680,2580)
  Bottom Layer w15: v1(2680,2580) X001.3
NetR406_1: R406.1 X401.33 | length 502.3
  Top Layer w10: 2060,1450 2101.06,1408.94 2101.06,1336.54 2150,1287.6 X401.33
  Top Layer w15: 2060,1450 R406.1
NetR406_2: R406.2 X002.3 | length 1227.3
  Top Layer w15: R406.2 2060,2060 2500,2500 v1(2500,2580)
  Bottom Layer w15: v1(2500,2580) X002.3
NetR407_1: R407.1 X401.35 | length 498.1
  Top Layer w10: 1970,1450 2006.06,1413.94 2006.06,1331.54 2050,1287.6 X401.35
  Top Layer w15: 1970,1450 R407.1
NetR407_2: R407.2 X003.3 | length 1190
  Top Layer w15: R407.2 1970,2070 2320,2420 v1(2320,2580)
  Bottom Layer w15: v1(2320,2580) X003.3
NetR408_1: R408.1 X401.37 | length 494
  Top Layer w10: 1880,1450 1909.41,1420.59 1909.41,1328.19 1950,1287.6 X401.37
  Top Layer w15: 1880,1450 R408.1
NetR408_2: R408.2 X004.3 | length 1152.7
  Top Layer w15: R408.2 1880,2080 2140,2340 v1(2140,2580)
  Bottom Layer w15: v1(2140,2580) X004.3
NetR409_1: R409.1 X401.26 | length 918.8
  Top Layer w15: X401.26 2550,1070 2780,1070 2830,1120 2830,1420 2800,1450 R409.1
NetR410_1: R410.1 X401.28 | length 1371.9
  Top Layer w15: X401.28 2490,1030 3017.5,1030 3070,1082.5 3070,1230 2900,1400 R410.1
NetR411_1: R411.1 X401.34 | length 969.8
  Top Layer w15: R411.1 1422.5,1427.5 1432.5,1427.5 1690,1170 1690,1070 1730,1030 2010,1030 X401.34
NetR411_2: R411.2
NetR412_1: R412.1 X401.36 | length 943.3
  Top Layer w15: R412.1@1400,1560 R412.1 1422.5,1527.5 1472.5,1527.5 1510,1490 1510,1410 1730,1190 1730,1090 1760,1060 1940,1060 X401.36
NetR412_2: R412.2
NetR413_1: R413.1 X401.38 | length 898.7
  Top Layer w10: 1780,1450 1780,1350.57 1840.59,1289.98 1840.59,1272.01 1900,1212.6 X401.38
  Top Layer w15: R413.1@1600,1630 1610,1640 R413.1 1600,1710 1610,1720 1740,1720 1780,1680 1780,1450
NetR414_1: R414.1 X401.40 | length 571.4
  Top Layer w10: 1700,1450 1700,1280 1800,1180 X401.40
  Top Layer w15: 1700,1450 R414.1
NetR415_1: R415.1 X401.39 | length 468.6
  Top Layer w15: R415.1 v1(1480,1200)
  Bottom Layer w15: v1(1480,1200) 1530,1200 1550,1220 1660,1220 1685,1195 X401.39
NetR415_2: R415.2
pads on no net: J202.16 J202.17 J202.19 J202.22 J203.0 J203.8 J203.10 J203.18 J203.19 J203.28 J203.30 J203.33 J203.34 X301.5 X301.6 X301.7 X301.8 X301.9 X301.11 X301.24 X301.30 X301.32 X301.41 X301.42 X401.5 X401.6 X401.7 X401.8 X401.9 X401.11 X401.24 X401.30 X401.32 X401.41 X401.42

## Polygon pours and split planes (outlines as drawn)
GND on Top Layer "NONET_L-01_P-001" (solid, remove dead copper, pour order 0): 950,5450 1100,5600 6000,5600 6150,5450 6150,1250 5950,1050 1150,1050 950,1250
GND on Bottom Layer "NONET_L-01_P-001" (solid, remove dead copper, pour order 1): 949.81,5437.35 1099.81,5587.35 5999.81,5587.35 6149.81,5437.35 6149.81,1237.35 5949.81,1037.35 1149.81,1037.35 949.81,1237.35

## Keep-outs
Keep-Out Layer:
  the board outline again, w10

## Silkscreen, mask and mechanical layers (free items; w line width, h text height)
Top Overlay:
  drawing of 48 lines, arcs and shapes, not listed
  text "DUO-X-CARD-ADAPTER" at 1010,5090 h60
  text "Rev 1.0, 02.01.2025" at 1010,4979.99 h60
  text "(c) 2025 Chris Noeding" at 1000,4859.99 h60
  text "Ch1-8" at 5860,4335 h60
  text "Ch9-16" at 2365,4135 h60 r90
  text "Card Rdy" at 1020.01,4130 h60 r90
  text "<- MIDI Rx" at 1190,4120 h60 r90
  text "-> MIDI Tx" at 1470,4120 h60 r90
  text "-> UART Tx" at 1390,3960 h60
  text "<- UART Rx" at 1380,3680 h60
  text "<-" at 2170,3590 h60 r90
  text "<-" at 2350,3590 h60 r90
  text "<-" at 2530,3590 h60 r90
  text "<-" at 2707.41,3584 h60 r90
  text "TDM" at 1370,3490 h60 r270
  text "Ch25-32" at 2170,3140 h60 r90
  text "Ch17-24" at 2350,3140 h60 r90
  text "Ch9-16" at 2530,3140 h60 r90
  text "Ch1-8" at 2710,3140 h60 r90
  text "FPGA" at 2800,3010 h60
  text "Ch17-24" at 5785,2935 h60
  text "TDM" at 1370,2930 h60 r270
  text "Card#2" at 2790,2800 h60
  text "<-" at 2110,2680 h60 r270
  text "<-" at 2290,2680 h60 r270
  text "<-" at 2470,2680 h60 r270
  text "<-" at 2650,2680 h60 r270
  text "Select TDM" at 3300,2670 h60 r90
  text "Supply" at 3130,2429.99 h60
  text "<- BitClk" at 2030,2420 h60
  text "<- FS" at 2030,2320 h60
  text "GND" at 3310,2270 h60
  text "+5V" at 3300,2160 h60
  text "CARD #1" at 940,2130 h60
  text "<- BitClk" at 2830,2100 h60 r90
  text "<- FS" at 2930,2100 h60 r90
  text "+5V" at 3300,2050 h60
  text "-> MIDI Tx" at 920,1620 h60
  text "-> UART Tx" at 1550,1620 h60 r90
  text "<- UART Rx" at 1810,1620 h60 r90
  text "TDM" at 1840,1470 h60
  text "TDM" at 2350,1470 h60
  text "<- MIDI Rx" at 930,1330 h60
  text "Ch25-32" at 5510,1235 h60
  text "Card Rdy" at 970,1079.99 h60
  text "www.youtube.com/@pcdimmer" at 5990.01,1065 h60 r90
  text "www.github.com/xn--nding-jua" at 6115.01,1065 h60 r90
  text "CARD #2" at 3170,1060 h60 r90

## Text inside footprints (layer, text, board x,y; h text height)
J203: Top Overlay "To Vidor4k" at 4486.06,3423.07 h60 r180